# Altium PCB ARGUS.PcbDoc (part 3 of 4)
Units mm, origin at the board's own origin, x right, y up, seen from the top; angles counter-clockwise.
Board outline 134 x 81 mm, 6 copper layers (L1 [SIG], L2 [GND], L3 [PWR], L4 [SIG], L5 [GND], L6 [SIG]), stack 1.538 mm thick; 452 components, 305 nets, 1467 pads, 826 vias.
Unrouted connection lines stored in the file: 646.
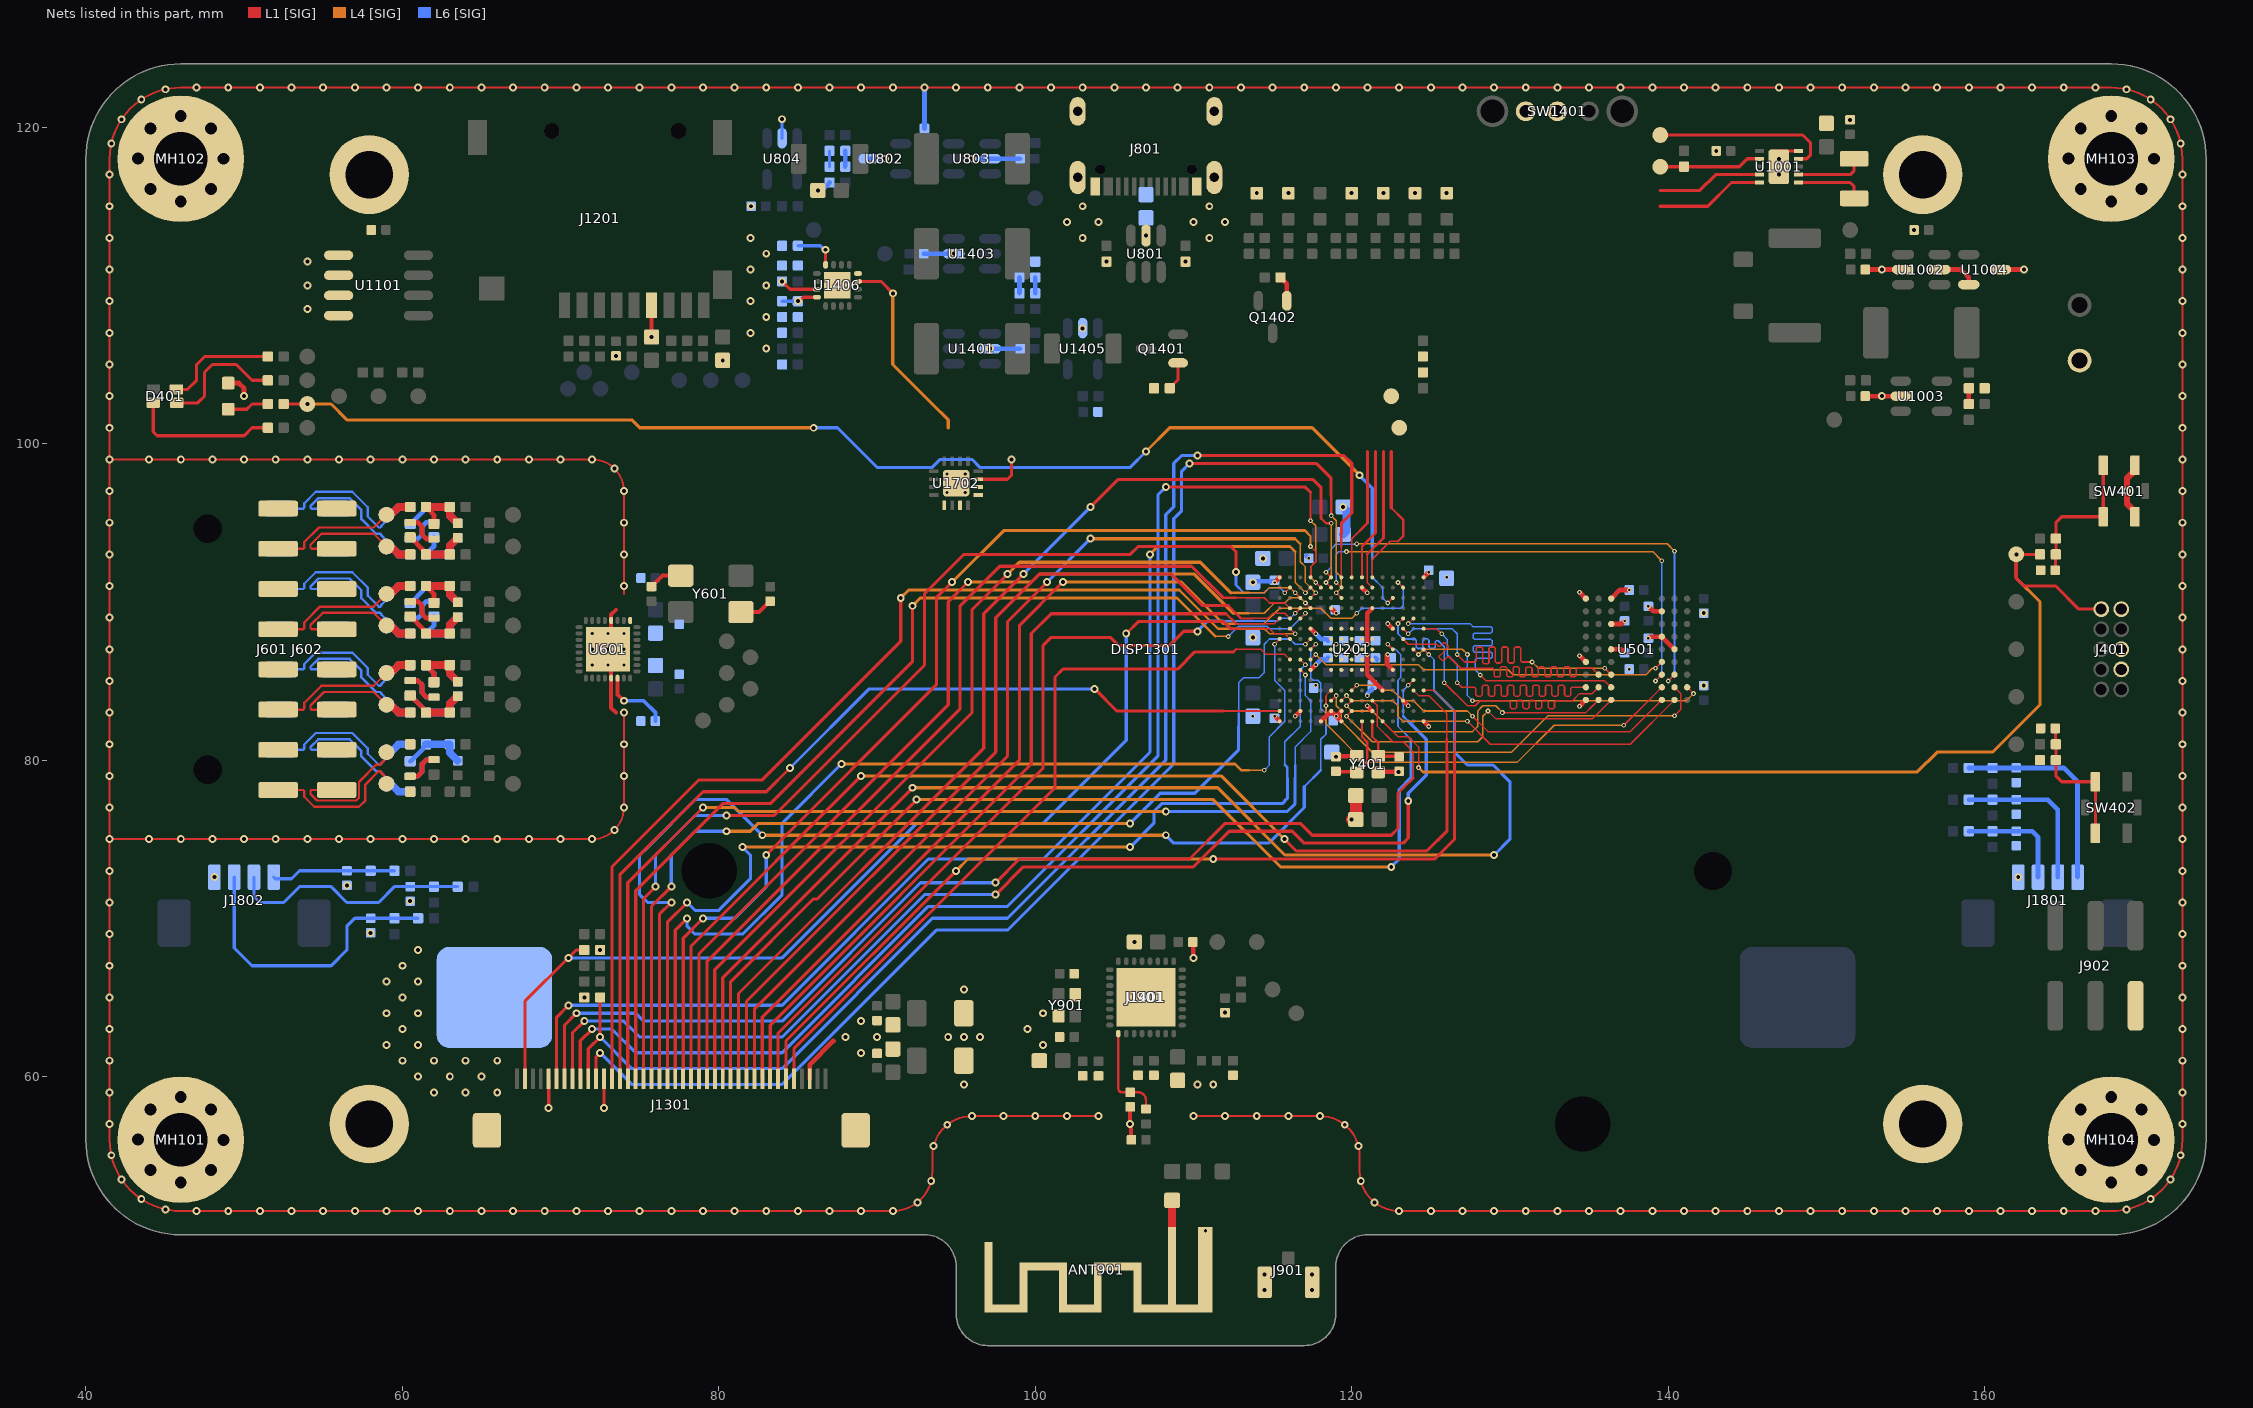
[diagram p7: the nets of this part, all layers, seen from the top]

## Via types
v1: diameter 0.5, hole 0.25, L1 [SIG] to L6 [SIG], tented both sides, 608 vias
v2: diameter 0.3, hole 0.15, L1 [SIG] to L6 [SIG], tented both sides, 209 vias
v3: diameter 0.5, hole 0.2, L1 [SIG] to L6 [SIG], tented both sides, 9 vias

## Nets (pads, with @x,y where several pads share a name; then routed paths per layer and width w, separated by ;. In a path a pad name is that pad's centre, name@x,y a point inside that pad or via, vN(x,y) a via of type N, cw(c..) or ccw(c..) an arc to the next point about the centre after c; other vN are vias at no path point) (continued)
FILT_2_P: C701_2.2 D701_2.1 R701_2.2 R702_2.1 | length 4.3
  L6 [SIG] w0.3: D701_2.1@60.5,79.925 60.525,79.925 61.325,80.725 61.325,80.825 R701_2.2@61.5,81
  L6 [SIG] w0.5: R701_2.2@61.5,81 R702_2.1@63,81 63,80.46 63.44,80.02 63.44,80.01 63.49,79.96 C701_2.2@63.5,79.96
FILT_3_N: C701_3.1 D702_3.1 R704_3.2 R705_3.1 | length 4
  L1 [SIG] w0.3: R704_3.2@61.5,86 62,85.5 D702_3.1@62,84.925
  L1 [SIG] w0.5: R704_3.2@61.5,86 R705_3.1@63,86 63,85.46 63.44,85.02 63.44,85.01 63.49,84.96 C701_3.1@63.5,84.96
FILT_3_P: C701_3.2 D701_3.1 R701_3.2 R702_3.1 | length 4.3
  L1 [SIG] w0.3: D701_3.1@60.5,84.075 60.525,84.075 61.325,83.275 61.325,83.175 R701_3.2@61.5,83
  L1 [SIG] w0.5: R701_3.2@61.5,83 R702_3.1@63,83 63,83.54 63.44,83.98 63.44,83.99 63.49,84.04 C701_3.2@63.5,84.04
FILT_4_N: C701_4.1 D702_4.1 R704_4.2 R705_4.1 | length 4.3
  L6 [SIG] w0.3: D702_4.1@60.5,84.075 60.525,84.075 61.325,83.275 61.325,83.175 R704_4.2@61.5,83
  L6 [SIG] w0.5: R704_4.2@61.5,83 R705_4.1@63,83 63,83.54 63.44,83.98 63.44,83.99 63.49,84.04 C701_4.1@63.5,84.04
FILT_4_P: C701_4.2 D701_4.1 R701_4.2 R702_4.1 | length 4
  L6 [SIG] w0.3: R701_4.2@61.5,86 62,85.5 D701_4.1@62,84.925
  L6 [SIG] w0.5: R701_4.2@61.5,86 R702_4.1@63,86 63,85.46 63.44,85.02 63.44,85.01 63.49,84.96 C701_4.2@63.5,84.96
FILT_5_N: C701_5.1 D702_5.1 R704_5.2 R705_5.1 | length 4
  L1 [SIG] w0.3: R704_5.2@61.5,91 62,90.5 D702_5.1@62,89.925
  L1 [SIG] w0.5: R704_5.2@61.5,91 R705_5.1@63,91 63,90.46 63.44,90.02 63.44,90.01 63.49,89.96 C701_5.1@63.5,89.96
FILT_5_P: C701_5.2 D701_5.1 R701_5.2 R702_5.1 | length 4.3
  L1 [SIG] w0.3: D701_5.1@60.5,89.075 60.525,89.075 61.325,88.275 61.325,88.175 R701_5.2@61.5,88
  L1 [SIG] w0.5: R701_5.2@61.5,88 R702_5.1@63,88 63,88.54 63.44,88.98 63.44,88.99 63.49,89.04 C701_5.2@63.5,89.04
FILT_6_N: C701_6.1 D702_6.1 R704_6.2 R705_6.1 | length 4
  L6 [SIG] w0.3: R704_6.2@61.5,88 62,88.5 D702_6.1@62,89.075
  L6 [SIG] w0.5: R704_6.2@61.5,88 R705_6.1@63,88 63,88.54 63.44,88.98 63.44,88.99 63.49,89.04 C701_6.1@63.5,89.04
FILT_6_P: C701_6.2 D701_6.1 R701_6.2 R702_6.1 | length 4.3
  L6 [SIG] w0.3: D701_6.1@60.5,89.925 60.525,89.925 61.325,90.725 61.325,90.825 R701_6.2@61.5,91
  L6 [SIG] w0.5: R701_6.2@61.5,91 R702_6.1@63,91 63,90.46 63.44,90.02 63.44,90.01 63.49,89.96 C701_6.2@63.5,89.96
FILT_7_N: C701_7.1 D702_7.1 R704_7.2 R705_7.1 | length 4
  L1 [SIG] w0.3: R704_7.2@61.5,96 62,95.5 D702_7.1@62,94.925
  L1 [SIG] w0.5: R704_7.2@61.5,96 R705_7.1@63,96 63,95.46 63.44,95.02 63.44,95.01 63.49,94.96 C701_7.1@63.5,94.96
FILT_7_P: C701_7.2 D701_7.1 R701_7.2 R702_7.1 | length 4.3
  L1 [SIG] w0.3: D701_7.1@60.5,94.075 60.525,94.075 61.325,93.275 61.325,93.175 R701_7.2@61.5,93
  L1 [SIG] w0.5: R701_7.2@61.5,93 R702_7.1@63,93 63,93.54 63.44,93.98 63.44,93.99 63.49,94.04 C701_7.2@63.5,94.04
FILT_8_N: C701_8.1 D702_8.1 R704_8.2 R705_8.1 | length 4
  L6 [SIG] w0.3: R704_8.2@61.5,93 62,93.5 D702_8.1@62,94.075
  L6 [SIG] w0.5: R704_8.2@61.5,93 R705_8.1@63,93 63,93.54 63.44,93.98 63.44,93.99 63.49,94.04 C701_8.1@63.5,94.04
FILT_8_P: C701_8.2 D701_8.1 R701_8.2 R702_8.1 | length 4.3
  L6 [SIG] w0.3: D701_8.1@60.5,94.925 60.525,94.925 61.325,95.725 61.325,95.825 R701_8.2@61.5,96
  L6 [SIG] w0.5: R701_8.2@61.5,96 R702_8.1@63,96 63,95.46 63.44,95.02 63.44,95.01 63.49,94.96 C701_8.2@63.5,94.96
GND: ANT901.1 C301.2 C302.2 C303.2 C304.2 C305.2 C306.2 C307.2 C308.2 C309.2 C310.2 C311.2 C312.2 C313.2 C314.2 C315.2 C316.2 C317.2 C318.2 C319.2 C320.2 C321.2 C322.2 C323.2 C324.2 C325.2 C326.2 C327.2 C401.2 C402.2 C403.2 C404.2 C501.2 C502.2 C503.2 C504.2 C505.2 C506.2 C507.2 C508.2 C601.2 C602.2 C603.2 C604.2 C605.2 C606.2 C607.2 C608.2 C801.2 C802.2 C803.2 C804.2 C901.2 C902.2 C903.2 C904.2 C905.2 C906.2 C907.2 C908.2 C909.2 C910.2 C911.2 C912.2 C913.2 C914.2 C1001.2 C1002.2 C1003.2 C1004.2 C1005.2 C1006.2 C1007.2 C1101.2 C1201.2 C1202.2 C1203.2 C1301.2 C1302.2 C1303.2 C1304.2 C1305.2 C1306.2 C1401.2 C1402.2 C1403.2 C1404.2 C1405.2 C1406.2 C1407.2 C1408.2 C1501.2 C1502.2 C1503.2 C1504.2 C1601.2 C1602.2 C1603.2 C1605.2 C1606.2 C1607.2 C1608.2 C1609.2 C1610.2 C1611.2 C1612.2 C1701.2 C1702.2 C1703.2 C1704.2 C1705.2 C1706.2 C1707.2 C1708.2 C1709.2 C1710.2 C1801.2 C1802.2 C1803.2 C1804.2 C1805.2 C1806.2 D402.2 D1401.2 D1402.2 D1405.2 D1501.2 D1601.2 D1602.2 DISP1301.M J401.3 J401.5 J401.9 J801.A1B12 J801.A12B1 J901.2 J901.3 J902.2 J1201.6 J1301.3 J1301.29 J1301.36 J1301.M J1401.2 J1801.4 J1802.4 MH101.1 MH102.1 MH103.1 MH104.1 R403.1 R801.2 R802.2 R808.2 R1008.2 R1302.2 R1303.2 R1406.2 R1410.2 R1413.2 R1417.2 R1425.2 R1426.2 R1427.2 R1428.2 R1429.2 R1430.2 R1431.2 R1504.2 R1601.2 R1607.2 R1612.2 R1702.2 SW401.2 SW1401.1 U201.A1 U201.A15 U201.C2 U201.D6 U201.D10 U201.E1 U201.F2 U201.F6 U201.F7 U201.F8 U201.F9 U201.F10 U201.F12 U201.G1 U201.G2 U201.G6 U201.G7 U201.G8 U201.G9 U201.G10 U201.H6 U201.H7 U201.H8 U201.H9 U201.H10 U201.J6 U201.J7 U201.J8 U201.J9 U201.J10 U201.J14 U201.K2 U201.K6 U201.K7 U201.K8 U201.K9 U201.K10 U201.K12 U201.L4 U201.M6 U201.M10 U201.N3 U201.R1 U201.R15 U501.A1 U501.A3 U501.B7 U501.C3 U501.D7 U501.E3 U501.E8 U501.F1 U501.J1 U601.13 U601.25 U601.28 U601.33 U801.2 U802.3 U803.2 U804.2 U901.33 U1001.5 U1001.11 U1002.2 U1003.2 U1004.3 U1101.1 U1101.2 U1101.3 U1101.4 U1401.2 U1403.2 U1404.2 U1405.2 U1406.8 U1406.17 U1501.11 U1502.2 U1601.5 U1601.6 U1601.9 U1601.13 U1602.2 U1603.2 U1604.2 U1701.9 U1701.17 U1702.9 U1702.17 Y401.2 Y401.4 Y601.2 Y601.4 Y901.2 Y901.4 | length 557.2
  L1 [SIG] w0.127: v1(41.5,91) v1(41.5,89) v1(41.5,87) 41.5,86 v1(41.5,85) v1(41.5,83) v1(41.5,81) v1(41.5,79) v1(41.5,77) v1(41.5,75) ; v1(41.5,91) v1(41.5,93) v1(41.5,95) v1(41.5,97) v1(41.5,99) ; v1(74,83) v1(74,77) cw(c72,77) v1(72,75) v1(50,75) v1(48,75) v1(41.5,75) ; 74,90.5 v1(74,97) ccw(c72,97) v1(72,99) v1(56,99) v1(54,99) v1(41.5,99) ; v1(104,57.5) v1(102,57.5) v1(96,57.5) ccw(c96,55) 93.5,55 93.5,54 cw(c91,54) v1(91,51.5) v1(57,51.5) 46,51.5 cw(c46,56) 41.5,56 v1(41.5,59) v1(41.5,61) v1(41.5,69) v1(41.5,71) v1(41.5,73) v1(41.5,75) ; v1(110,57.5) v1(116,57.5) v1(118,57.5) cw(c118,55) 120.5,55 120.5,54 ccw(c123,54) v1(123,51.5) 165,51.5 167,51.5 168,51.5 ccw(c168,56) 172.5,56 v1(172.5,59) 172.5,118 ccw(c168,118) 168,122.5 v1(107,122.5) v1(101,122.5) v1(99,122.5) v1(91,122.5) v1(89,122.5) 46,122.5 ccw(c46,118) 41.5,118 v1(41.5,101) v1(41.5,99)
  L1 [SIG] w0.2: v1(69.25,58) J1301.36@69.25,59.85 ; v1(72.75,58) J1301.29@72.75,59.85 ; U1001.11@146.5,118.5 U1001.5@148.238,118.5
  L1 [SIG] w0.25: v3(73,86) 73.2,85.8 U601.13@73.2,85.175 73.2,83.3 73.5,83 ; v3(73,88) 73.2,88.2 U601.28@73.2,88.825 73.2,89.2 73.5,89.5 ; C608.2@75.75,90.96 75.76,90.96 76.45,91.65 Y601.4@77.6,91.65 ; v1(75.75,106.738) J1201.6@75.75,108.75 ; Y601.2@81.4,89.35 82.55,89.35 83.24,90.04 C607.2@83.25,90.04 ; C913.2@106,58.08 v1(106,57) 106.04,56.96 106.04,56.04 C914.2@106.08,56 ; C905.2@112,64 112.02,64.02 v1(112,64.04)
  L1 [SIG] w0.3: D402.2@49,103.825 49.675,103.825 50,103.5 v1(50,103) ; J1301.3@85.75,59.85 85.75,60.75 87.25,62.25 ; C904.2@109.96,68.5 109.98,68.48 109.98,67.52 v1(110,67.5) ; v2(115.125,82.775) U201.A1@115.45,82.45 ; v2(115.125,91.225) U201.A15@115.45,91.55 ; v2(116.425,82.775) U201.C2@116.75,83.1 ; U201.D6@117.4,85.7 v2(117.725,86.025) ; U201.D10@117.4,88.3 v2(117.725,87.975) ; U201.E1@118.05,82.45 U201.F2@118.7,83.1 v2(119.025,82.775) ; U201.F12@118.7,89.6 v2(119.025,89.275) ; v1(119,80.21) 119.032,80.243 120.293,80.243 Y401.2@120.325,80.275 ; U201.G1@119.35,82.45 v2(119.025,82.775) ; U201.G2@119.35,83.1 v2(119.025,82.775) ; U201.J14@120.65,90.9 v2(120.975,90.575) ; v2(120.975,83.425) U201.K2@121.3,83.1 ; v2(120.975,86.675) 120.975,85.389 121.95,84.414 U201.L4@121.95,84.4 ; v2(120.975,87.325) 120.975,89.275 U201.K12@121.3,89.6 ; Y401.4@121.675,79.225 121.707,79.257 v1(122.968,79.257) C402.2@123,79.29 ; v2(122.275,88.625) U201.M10@122.6,88.3 ; v2(122.275,86.675) 122.234,86.634 122.234,86.066 U201.M6@122.6,85.7 ; U201.N3@123.25,83.75 v2(123.575,83.425) ; U201.R1@124.55,82.45 v2(124.875,82.125) ; U201.R15@124.55,91.55 v2(124.875,91.875) ; v2(134.4,83.4) U501.J1@134.8,83.8 ; v2(134.4,86.6) U501.F1@134.8,86.2 ; v2(134.4,90.6) U501.A1@134.8,90.2 ; U501.E3@136.4,87 137.04,87 v2(137.25,86.79) ; U501.C3@136.4,88.6 137.06,88.6 v2(137.25,88.79) ; U501.A3@136.4,90.2 136.95,90.75 v2(137.54,90.75) ; v2(138.75,87.71) 138.84,87.8 U501.D7@139.6,87.8 U501.E8@140.4,87 ; v2(138.75,89.71) 139.06,89.4 U501.B7@139.6,89.4 ; C1007.2@152.46,103 v1(153.5,103) U1003.2@154.7,103 ; C1006.2@152.46,111 v1(153.5,111) U1002.2@154.85,111 ; U1004.3@161,111 v1(162.5,111)
  L1 [SIG] w0.4: SW401.2@169.5,95.375 169.5,95.7 169,96.2 169,97.8 169.5,98.3 SW401.2@169.5,98.625
  L1 [SIG] w0.75: v1(120,76.25) C316.2@120.262,76.25 C314.2@120.262,77.75
  L6 [SIG] w0.2: U804.2@84,119.3 v1(84,120.5)
  L6 [SIG] w0.3: v1(86.262,116) 86.301,116.038 86.538,116.038 R808.2@87,116.5 ; U802.3@89.5,118 v1(90.5,118) ; C1402.2@92.96,112 v1(94.85,112) ; C802.2@93,119.92 v1(93,122.5) ; v1(96,118) U803.2@97.15,118 C803.2@99.04,118 ; v1(97.15,106) C1401.2@99.04,106 ; v1(113.75,91.238) 113.811,91.299 115.051,91.299 v2(115.125,91.225) ; C320.2@117.139,92.91 117.14,92.91 117.29,92.76 v2(117.29,92.75) ; v2(117.725,86.025) 118.055,86.355 118.395,86.355 C304.2@118.5,86.46 ; v2(117.725,87.975) 118.073,87.628 118.412,87.628 C305.2@118.5,87.54 ; v2(120.975,84.075) 120.975,84.185 C315.2@121.29,84.5 ; C312.2@121.5,86.46 C312.2@121.599,86.361
  L6 [SIG] w0.5: C319.2@119.462,94.25 119.675,94.462 119.675,95.788 v1(119.462,96)
  other v1: 114.5,46.5 117.5,46.5 114.5,47.5 117.5,47.5 47,51.5 49,51.5 51,51.5 53,51.5 55,51.5 59,51.5 61,51.5 63,51.5 65,51.5 67,51.5 69,51.5 71,51.5 73,51.5 75,51.5 77,51.5 79,51.5 81,51.5 83,51.5 85,51.5 87,51.5 89,51.5 125,51.5 127,51.5 129,51.5 131,51.5 133,51.5 135,51.5 137,51.5 139,51.5 141,51.5 143,51.5 145,51.5 147,51.5 149,51.5 151,51.5 153,51.5 155,51.5 157,51.5 159,51.5 161,51.5 163,51.5 165,51.5 167,51.5 45.024,51.607 168.976,51.607 92.562,52.048 121.438,52.048 43.504,52.256 170.496,52.256 93.425,53.394 120.575,53.394 42.256,53.504 171.744,53.504 41.607,55.024 172.393,55.024 93.575,55.606 120.425,55.606 94.438,56.952 119.562,56.952 41.5,57 172.5,57 98,57.5 100,57.5 112,57.5 114,57.5 62,59 64,59 66,59 95.5,59.5 110.25,59.5 111.25,59.5 61,60 63,60 65,60 60,61 62,61 64,61 66,61 172.5,61 89,61.5 59,62 61,62 100.5,62 88,62.5 90,62.5 94.5,62.5 95.5,62.5 96.5,62.5 41.5,63 60,63 99.5,63 172.5,63 89,63.5 59,64 61,64 100.5,64 41.5,65 60,65 71.5,65 172.5,65 95.5,65.5 59,66 61,66 41.5,67 60,67 172.5,67 61,68 72.5,68 106.262,68.5 172.5,69 58,69.08 172.5,71 60.5,71.08 56.5,72.08 48.125,72.6 162.125,72.6 172.5,73 44,75 46,75 52,75 54,75 56,75 58,75 60,75 62,75 64,75 66,75 68,75 70,75 172.5,75 73.414,75.586 172.5,77 74,79 172.5,79 74,81 172.5,81 172.5,83 142.25,84.71 172.5,85 172.5,87 113.75,87.738 172.5,89 142.25,89.29 74,91 172.5,91 114.387,92.75 74,93 172.5,93 74,95 172.5,95 169,97 172.5,97 73.414,98.414 44,99 46,99 48,99 50,99 52,99 58,99 60,99 62,99 64,99 66,99 68,99 70,99 172.5,99 172.5,101 41.5,103 172.5,103 41.5,105 172.5,105 80.25,105.262 73.5,105.54 83,106 41.5,107 82,107 172.5,107 102.987,107.287 83,108 54,108.5 41.5,109 82,109 172.5,109 54,110 83,110 41.5,111 82,111 172.5,111 54,111.5 104.5,111.5 109.5,111.5 83,112 41.5,113 82,113 103,113 111,113 172.5,113 107,113.15 155.54,113.5 102,114 104,114 110,114 112,114 41.5,115 82.04,115 103,115 111,115 172.5,115 114,115.825 116,115.825 120,115.825 122,115.825 124,115.825 126,115.825 41.5,117 147,117 172.5,117 147,118 143.04,118.5 41.607,118.976 172.393,118.976 151.5,120.46 42.256,120.496 171.744,120.496 43.504,121.744 170.496,121.744 45.024,122.393 168.976,122.393 47,122.5 49,122.5 51,122.5 53,122.5 55,122.5 57,122.5 59,122.5 61,122.5 63,122.5 65,122.5 67,122.5 69,122.5 71,122.5 73,122.5 75,122.5 77,122.5 79,122.5 81,122.5 83,122.5 85,122.5 87,122.5 95,122.5 97,122.5 103,122.5 105,122.5 109,122.5 111,122.5 113,122.5 115,122.5 117,122.5 119,122.5 121,122.5 123,122.5 125,122.5 127,122.5 129,122.5 131,122.5 133,122.5 135,122.5 137,122.5 139,122.5 141,122.5 143,122.5 145,122.5 147,122.5 149,122.5 151,122.5 153,122.5 155,122.5 157,122.5 159,122.5 161,122.5 163,122.5 165,122.5 167,122.5
  other v2: 113.75,82.762 117.725,84.725 137.54,85.75 119.025,86.675 119.675,86.675 120.325,86.675 119.025,87.325 119.675,87.325 120.325,87.325 126.012,91.55
  other v3: 72,86 74,86 72,87 73,87 74,87 72,88 74,88
HEART_BEAT: R408.1 TP408.1 U201.M13 | length 81.6
  L1 [SIG] w0.1: v2(122.275,89.925) U201.M13@122.6,90.25
  L1 [SIG] w0.2: R408.1@52.5,102.5 v1(54,102.5)
  L4 [SIG] w0.2: v1(54,102.5) 55.5,102.5 56.5,101.5 74.5,101.5 75,101 v1(86,101) ; v1(107,99.5) 108.5,101 117.5,101 v1(120.5,98)
  L6 [SIG] w0.1: 121.3,92.688 121.3,91.55 121.95,90.9 121.95,90.25 v2(122.275,89.925)
  L6 [SIG] w0.15: 121.3,92.688 121.3,93.5
  L6 [SIG] w0.2: v1(86,101) 87.5,101 90,98.5 93.5,98.5 94,99 96,99 96.5,98.5 106,98.5 v1(107,99.5) ; v1(120.5,98) 120.5,97.979 121.3,97.179 121.3,93.5
I\N\T\A: R1001.2 TP1001.1 U201.K15 U1001.9 | length 15.8
  L1 [SIG] w0.1: U201.K15@121.3,91.55 121.3,92.687 122.437,93.825 122.925,93.825
  L1 [SIG] w0.15: 122.5,95.944 123.25,95.194 123.25,94.15 122.925,93.825
  L1 [SIG] w0.2: 122.5,95.944 122.5,99.5 ; TP1001.1@139.5,117.5 R1001.2@141,117.5 144.5,117.5 145,118 U1001.9@145.762,118
I\N\T\B: TP1002.1 U201.K14 U1001.4 | length 20.5
  L1 [SIG] w0.1: 120.975,93.013 120.975,91.225 U201.K14@121.3,90.9
  L1 [SIG] w0.15: 120.975,93.013 122,94.038
  L1 [SIG] w0.2: 122,94.038 122,97.5 122,99.5 ; TP1002.1@139.5,119.5 148.5,119.5 149,119 149,118.25 148.75,118 U1001.4@148.238,118
IFA_IN: ANT901.2 R903.2 | length 4.4
  L1 [SIG] w0.5: ANT901.2@108.65,47.8 R903.2@108.65,52.175
ILIM: R1426.1 U1406.12 | length 2.8
  L1 [SIG] w0.2: U1406.12@86.75,111.3 v1(86.75,112.25)
  L6 [SIG] w0.2: R1426.1@85,112.5 86.419,112.5 86.669,112.25 v1(86.75,112.25)
IN_1_N: J601.15 J602.2 R704_8.1 TP603.1 | length 10.2
  L6 [SIG] w0.15: J602.2@55.75,95.89 54.27,95.89 54.2,95.96 54.2,96.059 54.695,96.554 56.671,96.554 57.414,95.812 57.414,95.228 58.342,94.3 58.607,94.3 58.676,94.23 58.676,94.189 59,93.865 TP603.1@59,93.5
  L6 [SIG] w0.5: TP603.1@59,93.5 59.271,93.5 59.771,93 R704_8.1@60.5,93
IN_1_P: J601.16 J602.1 R701_8.1 TP601.1 | length 10.9
  L6 [SIG] w0.15: J602.1@52.25,95.89 53.73,95.89 53.8,95.96 53.8,96.225 54.529,96.954 56.837,96.954 57.814,95.977 57.814,95.394 58.508,94.7 58.607,94.7 58.676,94.77 58.676,94.811 59,95.135 TP601.1@59,95.5
  L6 [SIG] w0.5: TP601.1@59,95.5 59.271,95.5 59.771,96 R701_8.1@60.5,96
IN_2_N: J601.13 J602.4 R704_7.1 TP608.1 | length 9.7
  L1 [SIG] w0.15: J601.13@52.15,93.35 53.73,93.35 53.8,93.42 53.8,93.774 54.726,94.7 58.2,94.7 TP608.1@59,95.5
  L1 [SIG] w0.5: TP608.1@59,95.5 59.271,95.5 59.771,96 R704_7.1@60.5,96
IN_2_P: J601.14 J602.3 R701_7.1 TP605.1 | length 9
  L1 [SIG] w0.15: J601.14@55.85,93.35 54.27,93.35 54.2,93.42 54.2,93.609 54.891,94.3 58.2,94.3 TP605.1@59,93.5
  L1 [SIG] w0.5: TP605.1@59,93.5 59.271,93.5 59.771,93 R701_7.1@60.5,93
IN_3_N: J601.11 J602.6 R704_6.1 TP612.1 | length 10.2
  L6 [SIG] w0.15: J602.6@55.75,90.81 54.27,90.81 54.2,90.88 54.2,90.979 54.695,91.474 56.671,91.474 57.414,90.732 57.414,90.228 58.342,89.3 58.607,89.3 58.676,89.23 58.676,89.189 59,88.865 TP612.1@59,88.5
  L6 [SIG] w0.5: TP612.1@59,88.5 59.271,88.5 59.771,88 R704_6.1@60.5,88
IN_3_P: J601.12 J602.5 R701_6.1 TP610.1 | length 10.8
  L6 [SIG] w0.15: J602.5@52.25,90.81 53.73,90.81 53.8,90.88 53.8,91.145 54.529,91.874 56.837,91.874 57.814,90.897 57.814,90.394 58.508,89.7 58.607,89.7 58.676,89.77 58.676,89.811 59,90.135 TP610.1@59,90.5
  L6 [SIG] w0.5: TP610.1@59,90.5 59.271,90.5 59.771,91 R701_6.1@60.5,91
IN_4_N: J601.9 J602.8 R704_5.1 TP616.1 | length 9.7
  L1 [SIG] w0.15: J601.9@52.15,88.27 53.73,88.27 53.8,88.34 53.8,88.694 54.806,89.7 58.2,89.7 TP616.1@59,90.5
  L1 [SIG] w0.5: TP616.1@59,90.5 59.271,90.5 59.771,91 R704_5.1@60.5,91
IN_4_P: J601.10 J602.7 R701_5.1 TP614.1 | length 9
  L1 [SIG] w0.15: J601.10@55.85,88.27 54.27,88.27 54.2,88.34 54.2,88.529 54.971,89.3 58.2,89.3 TP614.1@59,88.5
  L1 [SIG] w0.5: TP614.1@59,88.5 59.271,88.5 59.771,88 R701_5.1@60.5,88
IN_5_N: J601.7 J602.10 R704_4.1 TP620.1 | length 10.1
  L6 [SIG] w0.15: J602.10@55.75,85.73 54.27,85.73 54.2,85.8 54.2,85.899 54.695,86.394 56.671,86.394 57.414,85.652 57.414,85.228 58.342,84.3 58.607,84.3 58.676,84.23 58.676,84.189 59,83.865 TP620.1@59,83.5
  L6 [SIG] w0.5: TP620.1@59,83.5 59.271,83.5 59.771,83 R704_4.1@60.5,83
IN_5_P: J601.8 J602.9 R701_4.1 TP618.1 | length 10.7
  L6 [SIG] w0.15: J602.9@52.25,85.73 53.73,85.73 53.8,85.8 53.8,86.065 54.529,86.794 56.837,86.794 57.814,85.817 57.814,85.394 58.508,84.7 58.607,84.7 58.676,84.77 58.676,84.811 59,85.135 TP618.1@59,85.5
  L6 [SIG] w0.5: TP618.1@59,85.5 59.271,85.5 59.771,86 R701_4.1@60.5,86
IN_6_N: J601.5 J602.12 R704_3.1 TP624.1 | length 9.7
  L1 [SIG] w0.15: J601.5@52.15,83.19 53.73,83.19 53.8,83.26 53.8,83.614 54.886,84.7 58.2,84.7 TP624.1@59,85.5
  L1 [SIG] w0.5: TP624.1@59,85.5 59.271,85.5 59.771,86 R704_3.1@60.5,86
IN_6_P: J601.6 J602.11 R701_3.1 TP622.1 | length 9.1
  L1 [SIG] w0.15: J601.6@55.85,83.19 54.27,83.19 54.2,83.26 54.2,83.449 55.051,84.3 58.2,84.3 TP622.1@59,83.5
  L1 [SIG] w0.5: TP622.1@59,83.5 59.271,83.5 59.771,83 R701_3.1@60.5,83
IN_7_N: J601.3 J602.14 R704_2.1 TP628.1 | length 10
  L6 [SIG] w0.15: J602.14@55.75,80.65 54.27,80.65 54.2,80.72 54.2,80.819 54.695,81.314 56.671,81.314 57.414,80.572 57.414,80.228 58.342,79.3 58.607,79.3 58.676,79.23 58.676,79.189 59,78.865 TP628.1@59,78.5
  L6 [SIG] w0.5: TP628.1@59,78.5 59.271,78.5 59.771,78 R704_2.1@60.5,78
IN_7_P: J601.4 J602.13 R701_2.1 TP626.1 | length 10.7
  L6 [SIG] w0.15: J602.13@52.25,80.65 53.73,80.65 53.8,80.72 53.8,80.985 54.529,81.714 56.837,81.714 57.814,80.737 57.814,80.394 58.508,79.7 58.607,79.7 58.676,79.77 58.676,79.811 59,80.135 TP626.1@59,80.5
  L6 [SIG] w0.5: TP626.1@59,80.5 59.271,80.5 59.771,81 R701_2.1@60.5,81
IN_8_N: J601.1 J602.16 R704_1.1 TP632.1 | length 9.6
  L1 [SIG] w0.15: J601.1@52.15,78.11 53.73,78.11 53.8,78.04 53.8,77.686 54.44,77.046 57.26,77.046 57.664,77.45 57.664,78.456 58.508,79.3 58.607,79.3 58.676,79.23 58.676,79.189 59,78.865 TP632.1@59,78.5
IN_8_P: J601.2 J602.15 R701_1.1 TP630.1 | length 8.9
  L1 [SIG] w0.15: J601.2@55.85,78.11 54.27,78.11 54.2,78.04 54.2,77.851 54.605,77.446 57.095,77.446 57.264,77.615 57.264,78.622 58.342,79.7 58.607,79.7 58.676,79.77 58.676,79.811 59,80.135 TP630.1@59,80.5
ISET: R1429.1 R1430.1 U1406.16 | length 2.3
  L1 [SIG] w0.2: v1(85,109) 85.081,109 85.331,109.25 U1406.16@86.2,109.25
  L6 [SIG] w0.2: R1430.1@84,109 v1(85,109)
ITERM: R1428.1 U1406.15 | length 2.4
  L1 [SIG] w0.2: v1(84,110.25) 84.5,109.75 U1406.15@86.2,109.75
LCD_DISP: J1301.31 R1303.1 U201.G15 | length 88.2
  L1 [SIG] w0.1: U201.G15@119.35,91.55 119.35,93.5
  L1 [SIG] w0.15: 119.35,93.5 119.35,94.313
  L1 [SIG] w0.2: J1301.31@71.75,59.85 71.75,61.75 v1(72.5,62.5) R1303.1@72.5,65 ; v1(110.25,99.25) 119.5,99.25 120,98.75 120,95.613 119.35,94.962 119.35,94.313
  L6 [SIG] w0.2: v1(72.5,62.5) 74.5,60.5 84,60.5 93.5,70 98.25,70 108.25,80 108.25,95.5 108.75,96 108.75,98.75 109.25,99.25 v1(110.25,99.25)
LCD_PWM: J1301.35 U201.D14 | length 73.7
  L1 [SIG] w0.1: v2(117.075,90.575) U201.D14@117.4,90.9
  L1 [SIG] w0.2: J1301.35@69.75,59.85 69.75,63.75 v1(70.5,64.5)
  L4 [SIG] w0.1: 116.425,93.175 116.425,91.225 v2(117.075,90.575)
  L4 [SIG] w0.15: 116.1,93.5 116.425,93.175
  L4 [SIG] w0.2: v1(107.25,93) 107.75,93.5 116.1,93.5
  L6 [SIG] w0.2: v1(70.5,64.5) 84,64.5 93.25,73.75 100.5,73.75 107.25,80.5 v1(107.25,93)
LCD_RST: J1301.39 R1302.1 U201.B9 | length 68.8
  L1 [SIG] w0.1: 112.85,88.3 114.8,88.3 115.125,87.975 115.775,87.975 U201.B9@116.1,87.65
  L1 [SIG] w0.15: 112.362,88.3 112.85,88.3
  L1 [SIG] w0.2: J1301.39@67.75,59.85 67.75,64.75 v1(70.5,67.5) 71,68 R1302.1@71.5,68 ; v1(105.75,88) 105.771,88 106.521,88.75 111.912,88.75 112.362,88.3
  L6 [SIG] w0.2: v1(70.5,67.5) 84,67.5 92.5,76 100.5,76 105.75,81.25 v1(105.75,88)
LNA_IN: C913.1 L901.2 U901.1 | length 6.2
  L1 [SIG] w0.156: U901.1@105.25,62.712 105.25,59.25 ccw(c105.5,59.25) 105.5,59 C913.1@106,59 106.5,59 cw(c106.5,58.5) 107,58.5 L901.2@107,57.95
LTDC_B0: J1301.21 U201.C7 | length 64.6
  L1 [SIG] w0.1: U201.C7@116.75,86.35 v2(117.075,86.025)
  L1 [SIG] w0.2: J1301.21@76.75,59.85 76.75,69.75 v1(78,71)
  L4 [SIG] w0.2: v1(81.5,74.5) v1(106,74.5)
  L6 [SIG] w0.1: 115.775,79.688 115.775,81.15 116.75,82.125 116.75,85.7 v2(117.075,86.025)
  L6 [SIG] w0.15: 115.775,79.688 115.937,79.525 115.937,78.875
  L6 [SIG] w0.2: v1(78,71) 78.5,70.5 80,70.5 82,72.5 82,74 v1(81.5,74.5) ; v1(106,74.5) 107.5,76 107.5,76.75 108,77.25 115.612,77.25 115.937,77.575 115.937,78.875
LTDC_B1: J1301.22 U201.D8 | length 73.8
  L1 [SIG] w0.1: U201.D8@117.4,87 v2(117.725,87.325)
  L1 [SIG] w0.2: J1301.22@76.25,59.85 76.25,70.25 v1(77,71)
  L4 [SIG] w0.2: v1(82.75,75.25) v1(108.25,75.25)
  L6 [SIG] w0.1: 117.59,85.05 117.86,85.05 118.05,84.86 118.05,84.4 118.05,83.263 118.375,82.938 118.375,81.638 118.05,81.313 118.05,79.363 ; 117.59,85.05 117.562,85.05 117.4,85.212 117.4,85.51 117.4,87 v2(117.725,87.325)
  L6 [SIG] w0.15: 117,78.313 118.05,79.363
  L6 [SIG] w0.2: v1(77,71) 75.5,71 75,71.5 75,74 75.5,74.5 78.5,77.5 80.5,77.5 v1(82.75,75.25) ; v1(108.25,75.25) 108.75,74.75 114.75,74.75 117,77 117,78.313
LTDC_B2: J1301.23 U201.D9 | length 64.5
  L1 [SIG] w0.1: v2(117.075,87.325) U201.D9@117.4,87.65
  L1 [SIG] w0.2: J1301.23@75.75,59.85 75.75,70.75 v1(77,72)
  L4 [SIG] w0.2: v1(80.5,75.5) 82,75.5 82.5,76 v1(106,76)
  L6 [SIG] w0.1: 112.85,82.938 112.85,84.888 113.175,85.213 114.15,85.213 114.475,85.538 114.475,87.325 114.8,87.65 116.1,87.65 116.425,87.325 v2(117.075,87.325)
  L6 [SIG] w0.15: 112.85,82.125 112.85,82.938
  L6 [SIG] w0.2: v1(77,72) 77,74 78.5,75.5 v1(80.5,75.5) ; v1(106,76) 107.9,77.9 110.087,77.9 112.85,80.663 112.85,82.125
LTDC_B3: J1301.24 U201.B14 | length 68.1
  L1 [SIG] w0.1: v2(115.775,90.575) U201.B14@116.1,90.9
  L1 [SIG] w0.2: J1301.24@75.25,59.85 75.25,71.25 v1(76,72) ; v1(80.5,76.5) 83.5,76.5 93,86 93,90.5 95.5,93 106,93 106.5,93.5 112.362,93.5 112.687,93.175 v1(112.687,91.875)
  L6 [SIG] w0.1: 113.175,90.575 114.475,90.575 114.8,90.9 115.45,90.9 v2(115.775,90.575)
  L6 [SIG] w0.15: 112.687,91.063 113.175,90.575
  L6 [SIG] w0.2: v1(76,72) 76,74 78.5,76.5 v1(80.5,76.5) ; 112.687,91.063 v1(112.687,91.875)
LTDC_B4: J1301.25 U201.C11 | length 66.1
  L1 [SIG] w0.1: U201.C11@116.75,88.95 v2(117.075,89.275)
  L1 [SIG] w0.2: J1301.25@74.75,59.85 74.75,71.75 80.25,77.25 83.25,77.25 92.25,86.25 v1(92.25,89.75)
  L4 [SIG] w0.1: 111.387,87.813 v2(112.2,87.813)
  L4 [SIG] w0.15: 108.95,90.25 111.387,87.813
  L4 [SIG] w0.2: v1(92.25,89.75) 92.75,90.25 108.95,90.25
  L6 [SIG] w0.1: v2(112.2,87.813) 112.85,88.463 114.637,88.463 114.8,88.3 116.1,88.3 v2(117.075,89.275)
LTDC_B5: J1301.26 U201.C6 | length 66
  L1 [SIG] w0.1: U201.C6@116.75,85.7 v2(117.075,85.375)
  L1 [SIG] w0.2: J1301.26@74.25,59.85 74.25,72.25 v1(79,77)
  L4 [SIG] w0.2: v1(79,77) 81,77 81.25,76.75 v1(108.25,76.75)
  L6 [SIG] w0.1: 116.425,79.688 116.425,80.825 117.4,81.8 117.4,83.75 117.075,84.075 v2(117.075,85.375)
  L6 [SIG] w0.15: 116.425,78.875 116.425,79.688
  L6 [SIG] w0.2: v1(108.25,76.75) 115.925,76.75 116.425,77.25 116.425,78.875
LTDC_B6: J1301.27 U201.A2 | length 60
  L1 [SIG] w0.1: 112.687,83.1 U201.A2@115.45,83.1
  L1 [SIG] w0.15: 111.875,83.1 112.687,83.1
  L1 [SIG] w0.2: J1301.27@73.75,59.85 73.75,72.75 79,78 83,78 v1(84.5,79.5) ; v1(103.75,84.5) 105.15,83.1 111.875,83.1
  L6 [SIG] w0.2: v1(84.5,79.5) 89.5,84.5 v1(103.75,84.5)
LTDC_B7: J1301.28 U201.B10 | length 67
  L1 [SIG] w0.1: U201.B10@116.1,88.3 v2(116.425,87.975)
  L1 [SIG] w0.2: J1301.28@73.25,59.85 73.25,73.25 78.75,78.75 82.75,78.75 91.5,87.5 v1(91.5,90.25)
  L4 [SIG] w0.1: 114.475,88.3 114.8,87.975 v2(116.425,87.975)
  L4 [SIG] w0.15: 109.1,90.75 111.55,88.3 114.475,88.3
  L4 [SIG] w0.2: v1(91.5,90.25) 92,90.75 109.1,90.75
LTDC_CLK: J1301.30 U201.G13 | length 84.1
  L1 [SIG] w0.1: v2(119.025,90.575) U201.G13@119.35,90.25
  L1 [SIG] w0.15: v2(118.701,95.449) 118.701,96.749 118.7,96.75
  L1 [SIG] w0.2: J1301.30@72.25,59.85 72.25,61.25 v1(72.5,61.5) ; v1(109.75,98.75) 117.75,98.75 118.7,97.8 118.7,96.75
  L4 [SIG] w0.1: v2(118.701,95.449) 119.025,95.125 119.025,91.875 119.35,91.55 119.35,90.9 v2(119.025,90.575)
  L6 [SIG] w0.2: v1(72.5,61.5) 74.5,59.5 84,59.5 93.75,69.25 98.25,69.25 108.75,79.75 108.75,95.25 109.25,95.75 109.25,98.25 v1(109.75,98.75)
LTDC_DE: J1301.34 U201.K3 | length 72.2
  L1 [SIG] w0.1: U201.K3@121.3,83.75 121.625,83.425 121.625,82.125 122.6,81.15 123.25,81.15 123.9,80.5 123.9,78.875
  L1 [SIG] w0.15: 122.925,77.9 123.25,78.225 123.9,78.875
  L1 [SIG] w0.2: J1301.34@70.25,59.85 70.25,63.25 v1(71,64) ; v1(97.5,72.25) 99,73.75 109.75,73.75 112,76 116.75,76 117.5,75.25 122.5,75.25 122.925,75.675 122.925,77.9
  L6 [SIG] w0.2: v1(71,64) 74.75,64 75.25,63.5 84,63.5 92.75,72.25 v1(97.5,72.25)
LTDC_G0: J1301.13 U201.M8 | length 70.3
  L1 [SIG] w0.1: v2(122.275,87.325) U201.M8@122.6,87
  L1 [SIG] w0.2: J1301.13@80.75,59.85 80.75,66 85.971,71.221 86.221,71.221 v1(92.5,77.5)
  L4 [SIG] w0.2: v1(92.5,77.5) 111.25,77.5 115.5,73.25 v1(122.5,73.25)
  L6 [SIG] w0.1: v2(122.275,87.325) 122.6,87 122.763,87 122.925,86.838 123.087,86.675 123.087,85.212 122.925,85.05 122.925,82.125 123.737,81.313
  L6 [SIG] w0.15: 123.737,80.5 123.737,81.313
  L6 [SIG] w0.2: v1(122.5,73.25) 123,73.75 123,78.138 123.737,78.875 123.737,80.5
LTDC_G1: J1301.14 U201.R8 | length 78.5
  L1 [SIG] w0.1: U201.R8@124.55,87 v2(124.875,86.675)
  L1 [SIG] w0.2: J1301.14@80.25,59.85 80.25,66.25 v1(92.25,78.25)
  L4 [SIG] w0.2: v1(92.25,78.25) 111.525,78.25 115.775,74 v1(129,74)
  L6 [SIG] w0.1: v2(124.875,86.675) 125.2,86.35 125.2,84.4
  L6 [SIG] w0.15: 125.2,84.4 126.5,83.1
  L6 [SIG] w0.2: 126.5,83.1 126.5,80.5 127.312,79.688 128.937,79.688 130,78.625 130,75 v1(129,74)
LTDC_G2: J1301.15 U201.C13 | length 59.6
  L1 [SIG] w0.1: v2(116.425,90.575) U201.C13@116.75,90.25
  L1 [SIG] w0.2: J1301.15@79.75,59.85 79.75,66.75 96,83 96,89.5 v1(98.25,91.75)
  L4 [SIG] w0.1: 113.5,90.575 114.475,90.575 114.8,90.9 115.26,90.9 116.1,90.9 v2(116.425,90.575)
  L4 [SIG] w0.15: 112.362,90.575 113.5,90.575
  L4 [SIG] w0.2: v1(98.25,91.75) 99,92.5 110.437,92.5 112.362,90.575
LTDC_G3: J1301.16 U201.B12 | length 59.5
  L1 [SIG] w0.1: 112.687,90.25 114.475,90.25 114.8,89.925 115.775,89.925 U201.B12@116.1,89.6
  L1 [SIG] w0.15: 111.875,90.25 112.687,90.25
  L1 [SIG] w0.2: J1301.16@79.25,59.85 79.25,67.25 95.25,83.25 95.25,89.75 97.75,92.25 109.875,92.25 111.875,90.25
LTDC_G4: J1301.17 U201.D12 | length 62
  L1 [SIG] w0.1: v2(117.075,89.925) U201.D12@117.4,89.6
  L1 [SIG] w0.2: J1301.17@78.75,59.85 78.75,67.75 94.5,83.5 94.5,90 v1(95.75,91.25)
  L4 [SIG] w0.1: 113.5,89.275 114.475,89.275 115.125,89.925 115.775,89.925 116.1,90.25 116.75,90.25 v2(117.075,89.925)
  L4 [SIG] w0.15: 112.525,89.275 113.5,89.275
  L4 [SIG] w0.2: v1(95.75,91.25) 99.75,91.25 100.25,91.75 110.05,91.75 112.525,89.275
LTDC_G5: J1301.18 U201.P4 | length 73.2
  L1 [SIG] w0.1: U201.P4@123.9,84.4 124.225,84.075 124.875,84.075 126.012,82.937 126.012,81.313
  L1 [SIG] w0.15: 126.012,80.338 126.012,81.313
  L1 [SIG] w0.2: J1301.18@78.25,59.85 78.25,68.25 v1(89,79) ; v1(115.75,75) 116.5,74.25 124.75,74.25 126.012,75.512 126.012,80.338
  L4 [SIG] w0.2: v1(89,79) 111.75,79 v1(115.75,75)
LTDC_G6: J1301.19 U201.D15 | length 66.6
  L1 [SIG] w0.1: U201.D15@117.4,91.55 117.4,92.01 117.4,92.2 117.725,92.525 117.725,93.175 v2(117.4,93.5)
  L1 [SIG] w0.2: J1301.19@77.75,59.85 77.75,68.75 v1(79,70) ; v1(83,74) 93.75,84.75 93.75,90.25 v1(94.75,91.25)
  L4 [SIG] w0.15: 117.05,94.5 117.4,94.15 v2(117.4,93.5)
  L4 [SIG] w0.2: v1(94.75,91.25) 98,94.5 117.05,94.5
  L6 [SIG] w0.2: v1(79,70) 81,70 83,72 v1(83,74)
LTDC_G7: J1301.20 U201.A9 | length 64.1
  L1 [SIG] w0.1: v2(115.125,87.325) U201.A9@115.45,87.65
  L1 [SIG] w0.2: J1301.20@77.25,59.85 77.25,69.25 v1(78,70)
  L4 [SIG] w0.1: 113.5,79.363 v2(114.475,79.363)
  L4 [SIG] w0.15: 112.625,79.75 113.012,79.363 113.5,79.363
  L4 [SIG] w0.2: v1(87.75,79.75) 112.625,79.75
  L6 [SIG] w0.1: v2(114.475,79.363) 114.8,79.688 114.8,81.475 115.775,82.45 115.775,84.4 115.125,85.05 v2(115.125,87.325)
  L6 [SIG] w0.2: v1(78,70) 78,69.5 78.5,69 81.5,69 84,71.5 84,76 v1(87.75,79.75)
LTDC_HSYNC: J1301.32 U201.E14 | length 80.6
  L1 [SIG] w0.1: v2(117.725,91.225) U201.E14@118.05,90.9
  L1 [SIG] w0.15: v2(117.4,95.125) 117.4,96.913
  L1 [SIG] w0.2: J1301.32@71.25,59.85 71.25,62.25 v1(72,63) ; v1(108.25,97.25) 117.062,97.25 117.4,96.913
  L4 [SIG] w0.1: v2(117.4,95.125) 117.725,94.8 117.725,92.525 117.4,92.2 117.4,91.55 v2(117.725,91.225)
  L6 [SIG] w0.2: v1(72,63) 73.25,63 74.75,61.5 84,61.5 93.25,70.75 98.25,70.75 107.75,80.25 107.75,96.75 v1(108.25,97.25)
LTDC_R0: J1301.5 U201.B7 | length 48.1
  L1 [SIG] w0.1: 112.687,87 114.267,87 114.592,86.675 115.775,86.675 U201.B7@116.1,86.35
  L1 [SIG] w0.15: 112.525,86.838 112.687,87
  L1 [SIG] w0.2: J1301.5@84.75,59.85 84.75,61.75 101.25,78.25 101.25,85.25 101.75,85.75 109,85.75 110.088,86.838 112.525,86.838
LTDC_R1: J1301.6 U201.R4 | length 60.5
  L1 [SIG] w0.1: U201.R4@124.55,84.4 125.2,84.4 126.5,83.1 126.5,81.313
  L1 [SIG] w0.15: 126.5,80.338 126.5,81.313
  L1 [SIG] w0.2: J1301.6@84.25,59.85 84.25,62.25 v1(95,73) ; v1(111.25,73.75) 125.25,73.75 126.5,75 126.5,80.338
  L4 [SIG] w0.2: v1(95,73) 95.75,73.75 v1(111.25,73.75)
LTDC_R2: J1301.7 U201.C12 | length 52
  L1 [SIG] w0.1: v2(116.425,89.275) U201.C12@116.75,89.6
  L1 [SIG] w0.2: J1301.7@83.75,59.85 83.75,62.75 97.5,76.5 100.5,79.5 100.5,87.25 101,87.75 104.75,87.75 105.25,87.25 108.5,87.25 109.388,88.138 v1(110.25,88.138)
  L6 [SIG] w0.1: 115.287,88.788 115.45,88.95 116.1,88.95 v2(116.425,89.275)
  L6 [SIG] w0.15: 111.875,88.788 115.287,88.788
  L6 [SIG] w0.2: v1(110.25,88.138) 110.9,88.788 111.875,88.788
LTDC_R3: J1301.8 U201.A11 | length 51.6
  L1 [SIG] w0.1: 112.687,88.625 112.85,88.625 115.125,88.625 U201.A11@115.45,88.95
  L1 [SIG] w0.15: 112.063,89.25 112.687,88.625
  L1 [SIG] w0.2: J1301.8@83.25,59.85 83.25,63.25 99.75,79.75 99.75,88 101,89.25 112.063,89.25
LTDC_R4: J1301.9 U201.N14 | length 64.9
  L1 [SIG] w0.1: v2(122.925,91.225) U201.N14@123.25,90.9
  L1 [SIG] w0.2: J1301.9@82.75,59.85 82.75,63.75 99,80 99,88.5 v1(101.75,91.25)
  L4 [SIG] w0.1: 112.687,88.625 114.475,88.625 115.45,89.6 118.05,89.6 118.7,88.95 120,88.95 v2(120.325,89.275)
  L4 [SIG] w0.15: 109.25,91.25 111.875,88.625 112.687,88.625
  L4 [SIG] w0.2: v1(101.75,91.25) 109.25,91.25
  L6 [SIG] w0.1: v2(120.325,89.275) 120.65,89.6 123.087,89.6 123.25,89.763 123.25,90.9 v2(122.925,91.225)
LTDC_R5: J1301.10 U201.D13 | length 60.3
  L1 [SIG] w0.1: U201.D13@117.4,90.25 v2(117.725,90.575)
  L1 [SIG] w0.2: J1301.10@82.25,59.85 82.25,64.25 98.25,80.25 98.25,88.75 v1(100.75,91.25)
  L4 [SIG] w0.1: 116.75,93.663 116.75,92.525 117.075,92.2 117.075,91.225 v2(117.725,90.575)
  L4 [SIG] w0.15: 116.425,93.988 116.75,93.663
  L4 [SIG] w0.2: v1@103.487,93.988 116.425,93.988
  L6 [SIG] w0.2: v1(100.75,91.25) v1@103.487,93.988
  other v1: 103.5,94
LTDC_R6: J1301.11 U201.B11 | length 56.8
  L1 [SIG] w0.1: 113.753,88.95 114.7,88.95 115.025,89.275 115.775,89.275 U201.B11@116.1,88.95
  L1 [SIG] w0.15: 112.2,89.763 112.525,89.438 113.013,88.95 113.753,88.95
  L1 [SIG] w0.2: J1301.11@81.75,59.85 81.75,64.75 97.5,80.5 97.5,89 100.25,91.75 108.587,91.75 110.575,89.763 112.2,89.763
LTDC_R7: J1301.12 U201.F14 | length 67.9
  L1 [SIG] w0.1: v2(118.375,91.225) U201.F14@118.7,90.9
  L1 [SIG] w0.15: 118.05,95.288 118.375,94.963 v2(118.7,94.963)
  L1 [SIG] w0.2: J1301.12@81.25,59.85 81.25,65.25 96.75,80.75 96.75,89.25 v1(99.25,91.75) ; v1(103.5,96) 105.225,97.725 117.562,97.725 118.05,97.238 118.05,95.288
  L4 [SIG] w0.1: v2(118.375,91.225) 118.7,91.55 v2(118.7,94.963)
  L6 [SIG] w0.2: v1(99.25,91.75) v1(103.5,96)
LTDC_VSYNC: J1301.33 U201.P5 | length 73.6
  L1 [SIG] w0.1: v2(123.575,84.725) U201.P5@123.9,85.05
  L1 [SIG] w0.2: J1301.33@70.75,59.85 70.75,62.75 v1(71.5,63.5) ; v1(97.5,71.5) 99.25,73.25 110,73.25 112.25,75.5 116.25,75.5 117,74.75 123.25,74.75 123.575,75.075 v1(123.575,77.413)
  L6 [SIG] w0.1: 123.25,82.775 123.25,84.4 v2(123.575,84.725)
  L6 [SIG] w0.15: 123.25,82.775 123.575,82.45
  L6 [SIG] w0.2: v1(71.5,63.5) 74,63.5 75,62.5 84,62.5 93,71.5 v1(97.5,71.5) ; v1(123.575,77.413) 123.575,77.9 124.712,79.038 124.712,81.312 123.575,82.45
NetC403_1: C403.1 R401.1 R402.1 SW401.1 | length 9.4
  L1 [SIG] w0.2: C403.1@164.46,92 164.48,92.02 164.48,92.98 R402.1@164.5,93 R401.1@164.5,94 164.5,95 164.875,95.375 SW401.1@167.5,95.375 SW401.1@167.5,98.625
NetC404_1: C404.1 R403.2 R404.1 SW402.1 | length 8.9
  L1 [SIG] w0.2: C404.1@164.46,82 164.48,81.98 164.48,81.02 R404.1@164.5,81 R403.2@164.5,80 164.5,79 164.875,78.625 SW402.1@167,78.625 SW402.1@167,75.375
NetC801_1: C801.1 J801.SH
NetC1801_1: C1801.1 J1801.1 R1801.2 R1802.2 | length 13.3
  L6 [SIG] w0.3: R1802.2@159,79.5 R1801.2@160.5,79.5 C1801.1@162,79.5 165,79.5 165.875,78.625 J1801.1@165.875,72.6
NetC1802_1: C1802.1 J1801.2 R1803.2 R1804.2 | length 10.2
  L6 [SIG] w0.3: R1804.2@159,77.5 R1803.2@160.5,77.5 C1802.1@162,77.5 164,77.5 164.625,76.875 J1801.2@164.625,72.6
NetC1803_1: C1803.1 J1801.3 R1805.2 R1806.2 | length 7.1
  L6 [SIG] w0.3: R1806.2@159,75.5 R1805.2@160.5,75.5 C1803.1@162,75.5 163,75.5 163.375,75.125 J1801.3@163.375,72.6
NetC1804_1: C1804.1 J1802.1 R1807.2 R1808.2 | length 7.9
  L6 [SIG] w0.2: J1802.1@51.875,72.6 51.975,72.5 53,72.5 53.5,73 C1804.1@56.5,73 R1807.2@58,73 R1808.2@59.5,73
NetC1805_1: C1805.1 J1802.2 R1809.2 R1810.2 | length 15.5
  L6 [SIG] w0.2: J1802.2@50.625,72.6 50.625,71.375 51,71 52.5,71 53.5,72 55.5,72 56.5,71 58.5,71 59.5,72 C1805.1@60.5,72 R1809.2@62,72 R1810.2@63.5,72
NetC1806_1: C1806.1 J1802.3 R1811.2 R1812.2 | length 18.7
  L6 [SIG] w0.2: J1802.3@49.375,72.6 49.375,68.125 50.5,67 55.5,67 56.5,68 56.5,69.5 57,70 C1806.1@58,70 R1811.2@59.5,70 R1812.2@61,70
NetD401_1: D401.1 R405.2 | length 7.2
  L1 [SIG] w0.2: D401.1@45.725,103.425 46.425,103.425 47,104 47,105 47.5,105.5 R405.2@51.5,105.5
NetD401_2: D401.2 R406.2 | length 8.1
  L1 [SIG] w0.2: D401.2@45.745,102.575 47.075,102.575 47.5,103 47.5,104.5 48,105 49.5,105 50.5,104 R406.2@51.5,104
NetD401_3: D401.3 R407.2 | length 9.4
  L1 [SIG] w0.2: D401.3@44.255,102.575 44.255,100.745 44.5,100.5 50,100.5 50.5,101 R407.2@51.5,101
NetD402_1: D402.1 R408.2 | length 2.6
  L1 [SIG] w0.2: D402.1@49,102.175 50.175,102.175 50.5,102.5 R408.2@51.5,102.5
NetD701_1_2: D701_1.2 D702_1.2 | length 2.2
  L1 [SIG] w0.3: D701_1.2@60.5,78.975 60.975,78.975 61.25,79.25 61.25,79.75 61.525,80.025 D702_1.2@62,80.025
NetD701_2_2: D701_2.2 D702_2.2 | length 2.2
  L6 [SIG] w0.3: D701_2.2@60.5,78.975 60.975,78.975 61.25,79.25 61.25,79.75 61.525,80.025 D702_2.2@62,80.025
NetD701_3_2: D701_3.2 D702_3.2 | length 2.2
  L1 [SIG] w0.3: D701_3.2@60.5,85.025 60.975,85.025 61.25,84.75 61.25,84.25 61.525,83.975 D702_3.2@62,83.975
NetD701_4_2: D701_4.2 D702_4.2 | length 2.2
  L6 [SIG] w0.3: D702_4.2@60.5,85.025 60.975,85.025 61.25,84.75 61.25,84.25 61.525,83.975 D701_4.2@62,83.975
NetD701_5_2: D701_5.2 D702_5.2 | length 2.2
  L1 [SIG] w0.3: D701_5.2@60.5,90.025 60.975,90.025 61.25,89.75 61.25,89.25 61.525,88.975 D702_5.2@62,88.975
NetD701_6_2: D701_6.2 D702_6.2 | length 2.2
  L6 [SIG] w0.3: D701_6.2@60.5,88.975 60.975,88.975 61.25,89.25 61.25,89.75 61.525,90.025 D702_6.2@62,90.025
NetD701_7_2: D701_7.2 D702_7.2 | length 2.2
  L1 [SIG] w0.3: D701_7.2@60.5,95.025 60.975,95.025 61.25,94.75 61.25,94.25 61.525,93.975 D702_7.2@62,93.975
NetD701_8_2: D701_8.2 D702_8.2 | length 2.2
  L6 [SIG] w0.3: D701_8.2@60.5,93.975 60.975,93.975 61.25,94.25 61.25,94.75 61.525,95.025 D702_8.2@62,95.025
NetQ1401_1: Q1401.1 R1413.1 | length 1.8
  L1 [SIG] w0.2: R1413.1@108.5,103.5 109.025,104.025 Q1401.1@109.025,105.1
NetR805_1: R805.1 R806.2 | length 1
  L6 [SIG] w0.3: R805.1@88,117.5 R806.2@88,118.5
NetR807_2: R807.2 R808.1 | length 1
  L6 [SIG] w0.2: R808.1@87,117.5 R807.2@87,118.5
NetR1006_2: R1006.2 R1007.1 | length 1
  L1 [SIG] w0.3: R1007.1@159,102.5 R1006.2@159,103.5
NetR1405_2: R1405.2 R1406.1
NetR1407_1: R1407.1 R1408.2 | length 1
  L6 [SIG] w0.3: R1408.2@99,109.5 R1407.1@99,110.5
NetR1409_2: R1409.2 R1410.1 | length 1
  L6 [SIG] w0.3: R1409.2@100,109.5 R1410.1@100,110.5
NetR1501_1: R1501.1 R1502.2
NetR1503_2: R1503.2 R1504.1
NetR1601_1: R1601.1 U1601.4
NetR1605_2: R1605.2 R1606.1
NetR1610_2: R1610.2 R1611.1
NetR1701_1: R1701.1 U1701.11
NetR1702_1: R1702.1 U1702.11
OSC_IN: C401.1 U201.J1 Y401.3 | length 5
  L1 [SIG] w0.15: C401.1@119,79.29 C401.1@119.032,79.258 ; Y401.3@120.292,79.258 Y401.3@120.325,79.225 ; Y401.3@120.375,79.225 120.975,79.825 120.975,81.15 120.65,81.475 U201.J1@120.65,82.45
  L1 [SIG] w0.2: C401.1@119.032,79.258 Y401.3@120.292,79.258
OUT_OUT: C402.1 U201.K1 Y401.1 | length 3.7
  L1 [SIG] w0.15: U201.K1@121.3,82.45 121.3,81.475 121.675,81.1 Y401.1@121.675,80.275 Y401.1@121.707,80.243 ; C402.1@122.967,80.243 C402.1@123,80.21
  L1 [SIG] w0.2: Y401.1@121.707,80.243 C402.1@122.967,80.243
P\G\O\O\D\: TP1410.1 U1406.7 U1701.3 | length 12.5
  L1 [SIG] w0.2: U1406.7@88.8,110.25 90.25,110.25 v1(91,109.5)
  L4 [SIG] w0.2: v1(91,109.5) 91,105 93.5,102.5 94.5,101.5 94.5,101
PG: TP1502.1 U1501.5 U1702.15 | length 3.2
  L1 [SIG] w0.2: U1702.15@96.4,97.75 98.25,97.75 98.5,98 v1(98.5,99)
PWR_SW: Q1402.1 R1421.2 SW1401.3 | length 1.6
  L1 [SIG] w0.3: R1421.2@115.5,110.5 115.9,110.1 Q1402.1@115.9,109.025
R\S\T\: J401.10 R402.2 TP301.1 U201.L1 | length 64.7
  L1 [SIG] w0.1: U201.L1@121.95,82.45 122.925,81.475 123.575,81.475 124.225,80.825 v2(124.225,79.525)
  L1 [SIG] w0.2: R402.2@163.5,93 v1(162,93) 162,91.5 162.5,91 164.5,91 165.96,89.54 J401.10@167.365,89.54
  L4 [SIG] w0.15: v2(124.225,79.525) 124.5,79.25
  L4 [SIG] w0.2: 124.5,79.25 155.75,79.25 157,80.5 160.5,80.5 163.5,83.5 163.5,90 162,91.5 v1(162,93)
REFIN: C605.1 U601.14 | length 4.4
  L1 [SIG] w0.25: U601.14@73.6,85.175 73.6,84.15 v1(74,83.75)
  L6 [SIG] w0.25: v1(74,83.75) 75.25,83.75 76,83 C605.1@76,82.46
RTC_1V65_REF: U1002.5 U1004.2 | length 2.5
  L1 [SIG] w0.3: U1002.5@157.15,111 158.5,111 159,110.5 U1004.2@159,110.05
RTC_OSCI: U1001.1 Y1001.2 | length 4.4
  L1 [SIG] w0.2: U1001.1@148.238,116.5 151.5,116.5 151.75,116.25 Y1001.2@151.75,115.5
RTC_OSCO: U1001.2 Y1001.1 | length 4.4
  L1 [SIG] w0.2: U1001.2@148.238,117 151.5,117 151.75,117.25 Y1001.1@151.75,118
RTC_SCL: R1003.2 TP1004.1 U201.J15 U1001.7 U1701.13 U1702.13 | length 15
  L1 [SIG] w0.1: U201.J15@120.65,91.55 120.65,93.5
  L1 [SIG] w0.15: 120.65,93.5 121.5,94.35
  L1 [SIG] w0.2: 121.5,94.35 121.5,97.5 121.5,99.5 ; 139.5,116 142,116 143,117 U1001.7@145.762,117
RTC_SDA: R1002.2 TP1003.1 U201.H15 U1001.6 U1701.14 U1702.14 | length 15.2
  L1 [SIG] w0.1: U201.H15@120,91.55 120,93.988
  L1 [SIG] w0.15: 120,93.988 121,94.988
  L1 [SIG] w0.2: 121,94.988 121,95.8 121,99.5 ; 139.5,115 142.5,115 144,116.5 U1001.6@145.762,116.5
SDRAM_A0: U201.F4 U501.H7 | length 26.4
  L1 [SIG] w0.1: v2(118.375,83.425) 118.375,84.075 U201.F4@118.7,84.4 ; v2(137.2,82.2) 138.8,83.8 139.2,84.2 U501.H7@139.6,84.6
  L4 [SIG] w0.1: v2(118.375,83.425) 118.375,82.288 120.813,79.85 130.45,79.85 132.8,82.2 v2(137.2,82.2)
SDRAM_A1: U201.F3 U501.H8 | length 27.2
  L1 [SIG] w0.1: U201.F3@118.7,83.75 v2(119.025,84.075) ; v2(140.4,82.8) 140.8,83.2 140.8,84.2 U501.H8@140.4,84.6
  L4 [SIG] w0.1: v2(119.025,84.075) 119.025,83.425 119.35,83.1 119.35,82.45 121.3,80.5 130.1,80.5 132.4,82.8 v2(140.4,82.8)
SDRAM_A2: U201.G3 U501.J8 | length 24
  L1 [SIG] w0.1: U201.G3@119.35,83.75 v2(119.675,84.075) ; v2(127.312,82.45) 128.762,81 137.6,81 U501.J8@140.4,83.8
  L4 [SIG] w0.1: v2(119.675,84.075) 120,83.75 122.6,83.75 122.925,83.425 122.925,82.775 123.25,82.45 v2(127.312,82.45)
SDRAM_A3: U201.H4 U501.J7 | length 21.8
  L1 [SIG] w0.1: U201.H4@120,84.4 v2(120.325,84.725) ; v2(127.637,82.775) 128.612,81.8 137.6,81.8 139.2,83.4 U501.J7@139.6,83.8
  L4 [SIG] w0.1: v2(120.325,84.725) 121.625,84.725 121.95,84.4 122.6,84.4 123.25,83.75 123.9,83.75 124.55,83.1 127.312,83.1 v2(127.637,82.775)
SDRAM_A4: U201.H2 U501.J3 | length 20.1
  L1 [SIG] w0.1: v2(119.675,82.775) U201.H2@120,83.1 ; v2(128.612,83.1) 129.112,82.6 135.2,82.6 U501.J3@136.4,83.8
  L4 [SIG] w0.1: v2(119.675,82.775) 121.3,81.15 127.962,81.15 128.287,81.475 128.287,82.775 v2(128.612,83.1)
SDRAM_A5: U201.H3 U501.J2 | length 18.8
  L1 [SIG] w0.1: v2(119.675,83.425) U201.H3@120,83.75 ; v2(129.525,83) 134.8,83 135.2,83.4 U501.J2@135.6,83.8
  L4 [SIG] w0.1: v2(119.675,83.425) 120,83.1 121.3,83.1 122.6,81.8 127.637,81.8 127.962,82.125 127.962,83.1 128.287,83.425 129.1,83.425 v2(129.525,83)
SDRAM_A6: U201.P11 U501.H3 | length 23
  L1 [SIG] w0.1: v2(123.575,88.625) U201.P11@123.9,88.95 ; v2(128.125,85.375) 128.5,85 135.6,85 136,85 U501.H3@136.4,84.6
  L6 [SIG] w0.1: v2(123.575,88.625) 127.475,88.625 127.627,88.473 127.677,88.423 128.798,88.423 128.878,88.343 128.878,88.103 128.798,88.023 127.756,88.023 127.676,87.943 127.676,87.703 127.756,87.623 128.798,87.623 128.878,87.543 128.878,87.303 128.798,87.223 127.756,87.223 127.676,87.143 127.676,86.903 127.756,86.823 128.798,86.823 128.878,86.743 128.878,86.503 128.798,86.423 127.88,86.423 127.8,86.343 127.8,85.855 127.8,85.7 v2(128.125,85.375)
SDRAM_A7: U201.N11 U501.H2 | length 22.7
  L1 [SIG] w0.1: v2(122.925,88.625) U201.N11@123.25,88.95 ; v2(125.85,84.888) 127.313,83.425 127.8,83.425 128.125,83.75 129.488,83.75 129.938,83.75 130.018,83.67 130.018,83.334 130.098,83.254 130.338,83.254 130.418,83.334 130.418,83.692 130.498,83.772 130.738,83.772 130.818,83.692 130.818,83.334 130.898,83.254 131.138,83.254 131.218,83.334 131.218,83.692 131.298,83.772 131.538,83.772 131.618,83.692 131.618,83.334 131.698,83.254 131.938,83.254 132.018,83.334 132.018,83.692 132.098,83.772 132.338,83.772 132.418,83.692 132.418,83.334 132.498,83.254 132.738,83.254 132.818,83.334 132.818,83.67 132.898,83.75 133.606,83.75 133.95,83.75 134.4,84.2 135.2,84.2 U501.H2@135.6,84.6
  L6 [SIG] w0.1: v2(122.925,88.625) 122.925,87.975 123.24,87.66 123.25,87.65 124.004,87.65 124.084,87.57 124.084,87.132 124.164,87.052 124.404,87.052 124.484,87.132 124.484,87.576 124.564,87.656 124.804,87.656 124.884,87.576 124.884,87.132 124.964,87.052 125.204,87.052 125.284,87.132 125.284,87.456 125.364,87.536 125.477,87.536 125.527,87.486 125.85,87.163 v2(125.85,84.888)
SDRAM_A8: U201.R10 U501.H1 | length 22.1
  L1 [SIG] w0.1: U201.R10@124.55,88.3 125.362,88.3 v2(125.687,87.975) ; v2(126.662,84.888) 126.95,84.6 127.317,84.6 127.767,84.6 127.847,84.52 127.847,84.126 127.927,84.046 128.167,84.046 128.247,84.126 128.247,84.642 128.327,84.722 128.567,84.722 128.647,84.642 128.647,84.126 128.727,84.046 128.967,84.046 129.047,84.126 129.047,84.642 129.127,84.722 129.367,84.722 129.447,84.642 129.447,84.126 129.527,84.046 129.767,84.046 129.847,84.126 129.847,84.642 129.927,84.722 130.167,84.722 130.247,84.642 130.247,84.126 130.327,84.046 130.567,84.046 130.647,84.126 130.647,84.642 130.727,84.722 130.967,84.722 131.047,84.642 131.047,84.126 131.127,84.046 131.367,84.046 131.447,84.126 131.447,84.642 131.527,84.722 131.767,84.722 131.847,84.642 131.847,84.126 131.927,84.046 132.167,84.046 132.247,84.126 132.247,84.642 132.327,84.722 132.567,84.722 132.647,84.642 132.647,84.126 132.727,84.046 132.967,84.046 133.047,84.126 133.047,84.642 133.127,84.722 133.367,84.722 133.447,84.642 133.447,84.126 133.527,84.046 133.767,84.046 133.847,84.126 133.847,84.52 133.927,84.6 134.2,84.6 U501.H1@134.8,84.6
  L6 [SIG] w0.1: v2(125.687,87.975) 126.039,87.624 126.039,86.649 126.662,86.025 v2(126.662,84.888)
SDRAM_A9: U201.N10 U501.G3 | length 22.7
  L1 [SIG] w0.1: U201.N10@123.25,88.3 v2(123.575,87.975) ; v2(126.662,86.675) 127.137,86.2 127.749,86.2 127.799,86.2 127.879,86.28 127.879,87.066 127.959,87.146 128.199,87.146 128.279,87.066 128.279,86.16 128.359,86.08 128.599,86.08 128.679,86.16 128.679,87.066 128.759,87.146 128.999,87.146 129.079,87.066 129.079,86.215 129.159,86.135 129.399,86.135 129.479,86.215 129.479,87.066 129.559,87.146 129.799,87.146 129.879,87.066 129.879,86.215 129.959,86.135 130.199,86.135 130.279,86.215 130.279,87.066 130.359,87.146 130.599,87.146 130.679,87.066 130.679,86.28 130.759,86.2 130.996,86.2 v2(131.4,86.2) ; v2(136,85.8) U501.G3@136.4,85.4
  L4 [SIG] w0.1: v2(131.4,86.2) 131.8,85.8 v2(136,85.8)
  L6 [SIG] w0.1: v2(123.575,87.975) 123.9,88.3 126.337,88.3 126.662,87.975 v2(126.662,86.675)
SDRAM_A10: U201.P8 U501.H9 | length 21.6
  L1 [SIG] w0.1: U201.P8@123.9,87 v2(124.225,86.675) ; U501.H9@141.2,84.6 v2(141.6,84.2)
  L4 [SIG] w0.1: v2(124.225,86.675) 124.55,87 126.987,87 v2(127.312,86.675) ; v2(127.637,83.75) 141.15,83.75 v2(141.6,84.2)
  L6 [SIG] w0.1: v2(127.312,86.675) 127.312,84.075 v2(127.637,83.75)
SDRAM_A11: U201.N9 U501.G2 | length 22.2
  L1 [SIG] w0.1: U201.N9@123.25,87.65 123.575,87.325 125.362,87.325 125.451,87.237 125.486,87.201 125.599,87.201 125.802,87.405 125.916,87.405 126.085,87.235 126.085,87.122 125.543,86.58 125.543,86.466 125.713,86.297 125.826,86.297 126.052,86.523 126.165,86.523 126.22,86.467 126.887,85.8 128.467,85.8 128.917,85.8 128.997,85.72 128.997,85.345 129.077,85.265 129.317,85.265 129.397,85.345 129.397,85.822 129.477,85.902 129.717,85.902 129.797,85.822 129.797,85.345 129.877,85.265 130.117,85.265 130.197,85.345 130.197,85.822 130.277,85.902 130.517,85.902 130.597,85.822 130.597,85.345 130.677,85.265 130.917,85.265 130.997,85.345 130.997,85.795 131.077,85.875 131.317,85.875 131.397,85.795 131.397,85.345 131.477,85.265 131.717,85.265 131.797,85.345 131.797,85.822 131.877,85.902 132.117,85.902 132.197,85.822 132.197,85.345 132.277,85.265 132.517,85.265 132.597,85.345 132.597,85.822 132.677,85.902 132.917,85.902 132.997,85.822 132.997,85.345 133.077,85.265 133.317,85.265 133.397,85.345 133.397,85.822 133.477,85.902 133.717,85.902 133.797,85.822 133.797,85.345 133.877,85.265 134.117,85.265 134.197,85.345 134.197,85.72 134.277,85.8 134.385,85.8 135.2,85.8 U501.G2@135.6,85.4
SDRAM_BA0: U201.G14 U501.G7 | length 31.5
  L1 [SIG] w0.1: v2(119.025,91.225) U201.G14@119.35,90.9 ; v2(139.2,85) U501.G7@139.6,85.4
  L4 [SIG] w0.1: v2(119.675,93.175) 139.025,93.175 v2(139.6,92.6)
  L6 [SIG] w0.1: v2(119.025,91.225) 119.025,93.013 119.187,93.175 v2(119.675,93.175) ; v2(139.2,85) 139.6,85.4 v2(139.6,92.6)
SDRAM_BA1: U201.F15 U501.G8 | length 33
  L1 [SIG] w0.1: v2(118.375,91.875) U201.F15@118.7,91.55 ; v2(140,85) U501.G8@140.4,85.4
  L4 [SIG] w0.1: v2(120.325,93.662) 139.938,93.662 v2(140.4,93.2)
  L6 [SIG] w0.1: v2(118.375,91.875) 118.7,92.2 118.7,93.337 118.999,93.636 120.299,93.636 v2(120.325,93.662) ; v2(140,85) 140.4,85.4 v2(140.4,93.2)
SDRAM_CAS: U201.D7 U501.F7 | length 23.2
  L1 [SIG] w0.1: U201.D7@117.4,86.35 v2(117.725,86.675) ; v2(139.2,85.8) U501.F7@139.6,86.2
  L4 [SIG] w0.1: v2(117.725,86.675) 118.375,86.025 124.225,86.025 124.55,85.7 129.9,85.7 130.2,85.4 138.6,85.4 139,85.8 v2(139.2,85.8)